# Altium PCB Pukk-Sensor-PCB.PcbDoc (part 5 of 6)
Units mil, origin at the board's own origin, x right, y up, seen from the top; angles counter-clockwise.
Board outline 3937.01 x 3149.61 mil, 4 copper layers (Top Layer, Layer 1, Layer 2, Bottom Layer), stack 61.653 mil thick; 261 components, 166 nets, 704 pads, 236 vias.
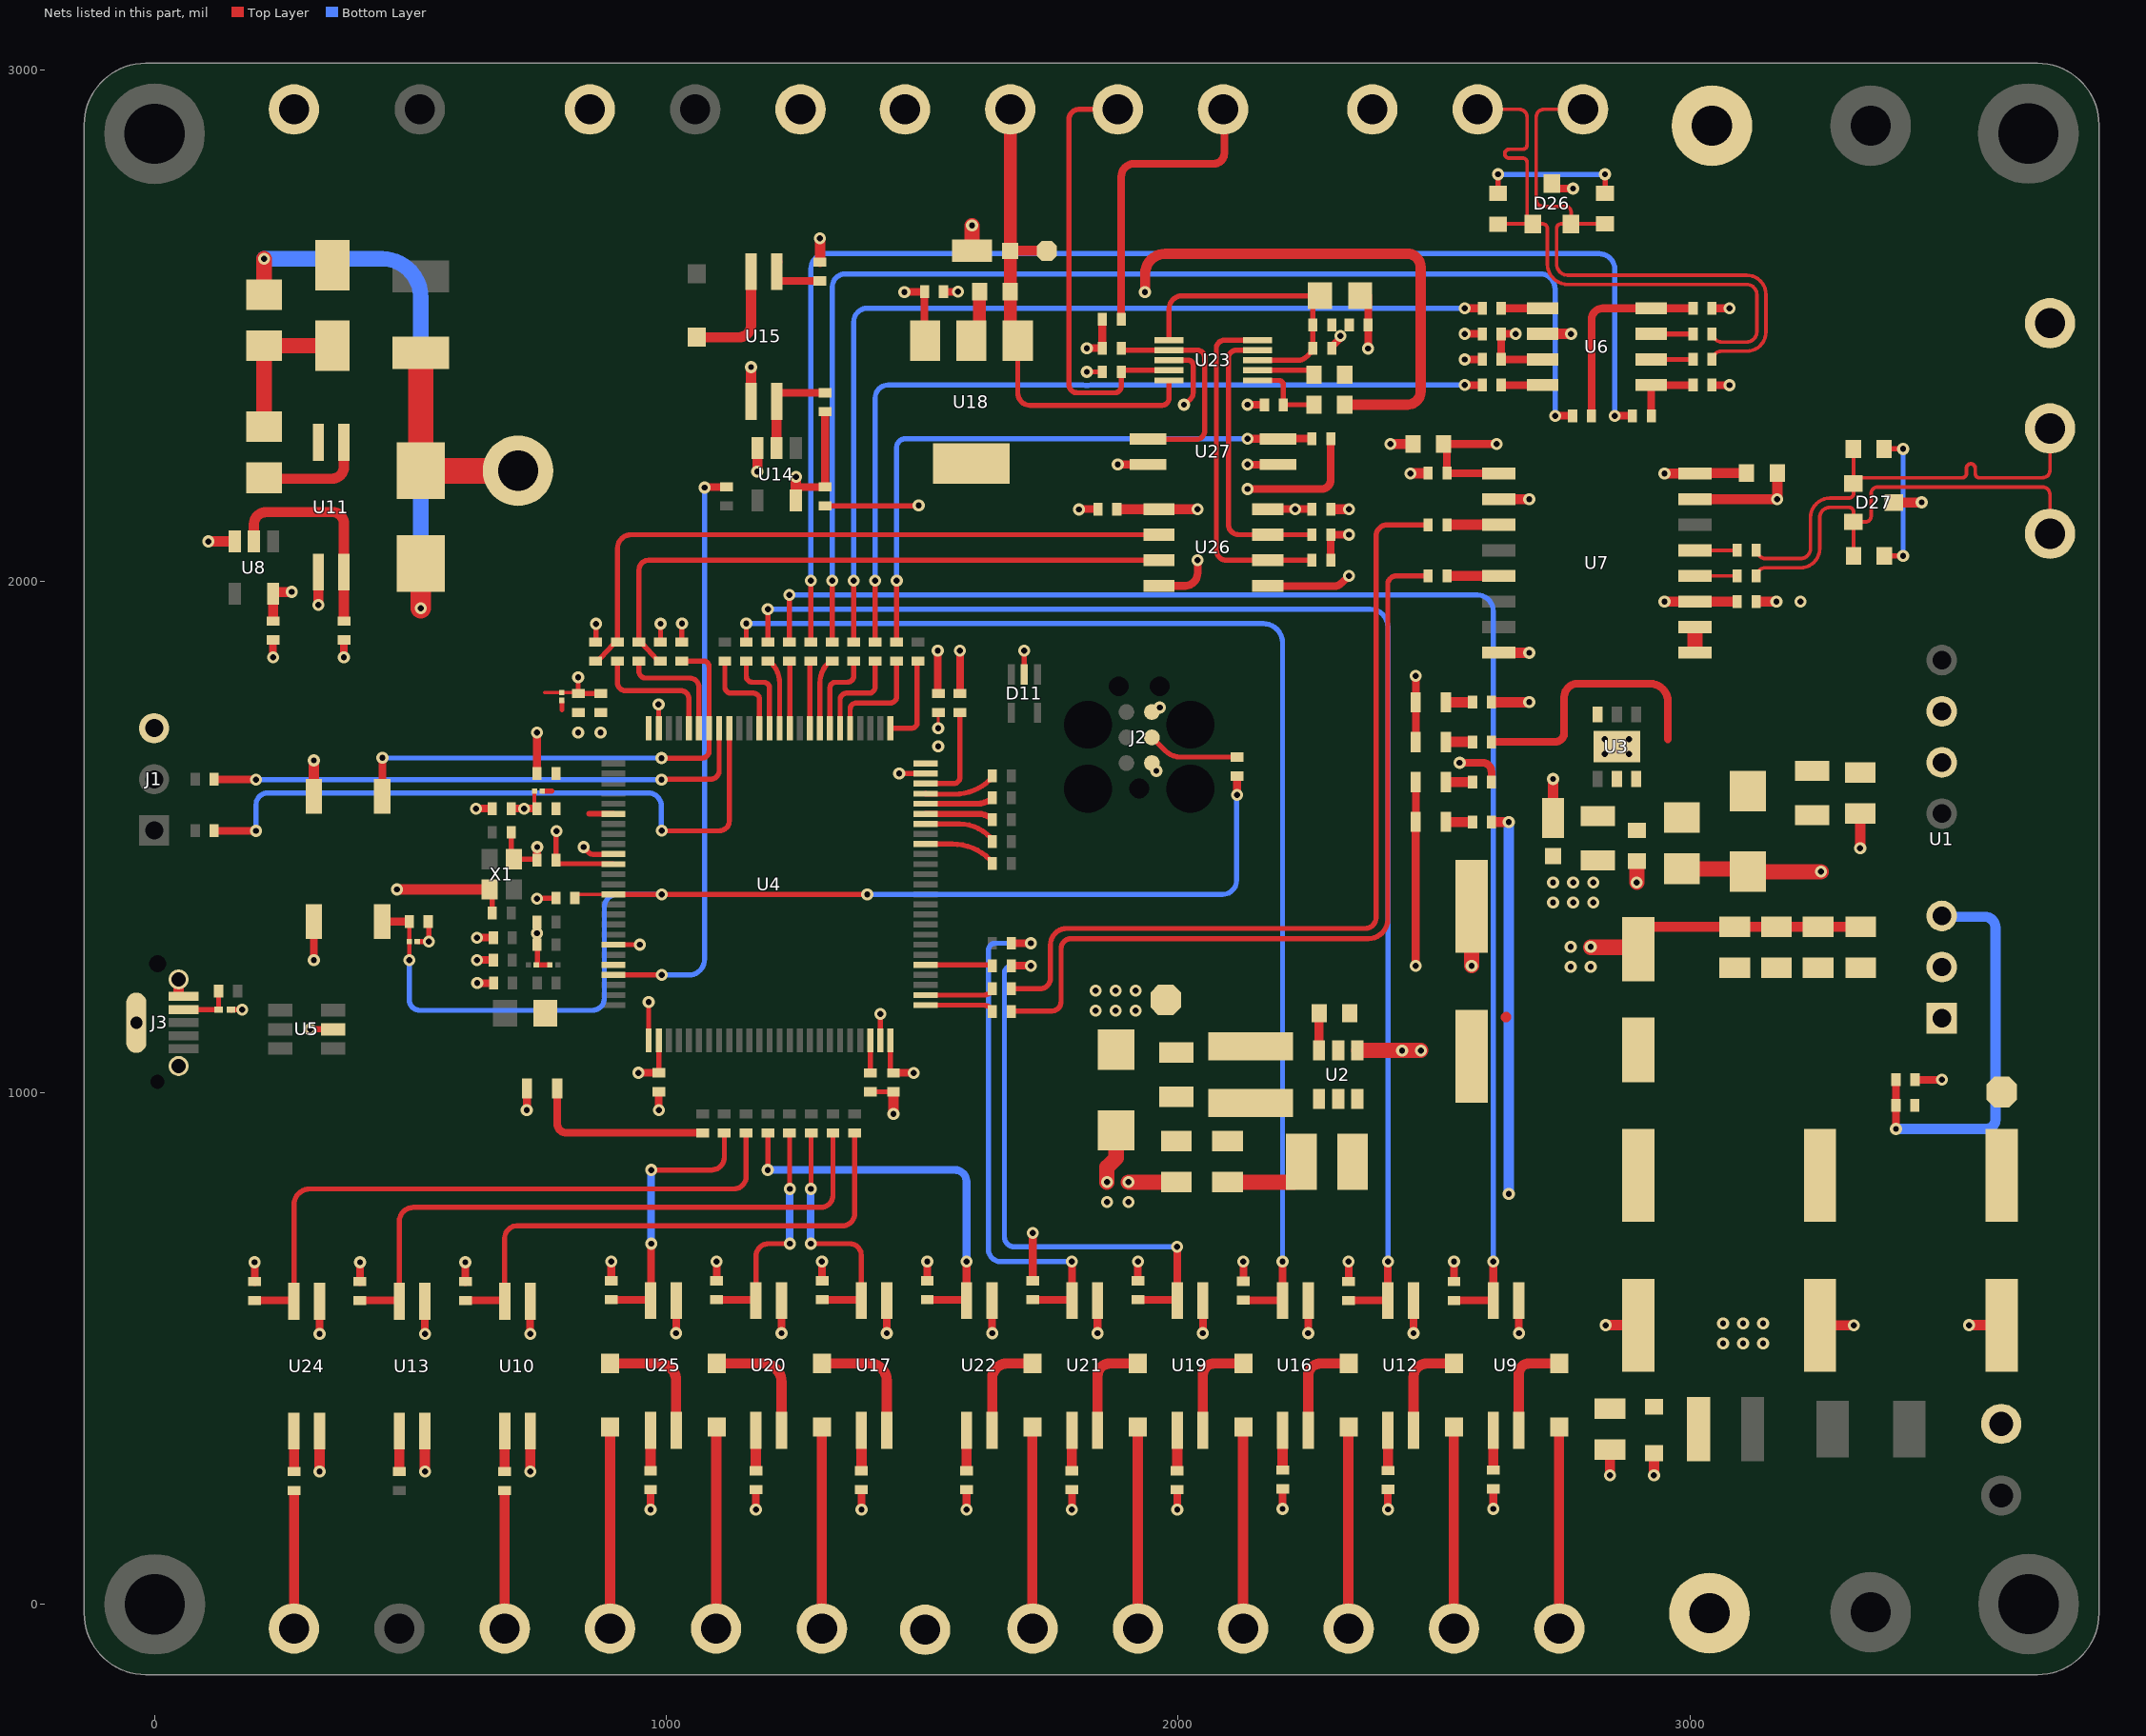
[diagram p4: the nets of this part, all layers, seen from the top]

## Via types
v1: diameter 23.62, hole 11.81, Top Layer to Bottom Layer, tented both sides, 234 vias
v2: diameter 23.62, hole 11.81, Top Layer to Bottom Layer, 2 vias

## Nets (pads, with @x,y where several pads share a name; then routed paths per layer and width w, separated by ;. In a path a pad name is that pad's centre, name@x,y a point inside that pad or via, vN(x,y) a via of type N, cw(c..) or ccw(c..) an arc to the next point about the centre after c; other vN are vias at no path point) (continued)
I2C_SDA: (continued)
  Top Layer w10: U23.9@2155.32,2451.36 2113.7,2451.36 ccw(c2113.7,2435.69) 2098.03,2435.69 2098.03,2110.91 ccw(c2118.22,2110.91) 2118.22,2090.72 U26.7@2175,2090.72 R98.1@2261.31,2090.72
LEFT: P4.1 R65.1 | length 267.5
  Top Layer w20: P4.1@683.76,-47.43 R65.1@683.76,220.03
NetC1_2: C1.2 F1.1 U1.6
NetC7_1: C7.1 L1.1 U2.5
NetC7_2: C7.2 U2.6 | length 75.6
  Top Layer w10: C7.2@2270.37,1155.28 cw(c2270.37,1150.28) C7.2@2275.38,1150.28
  Top Layer w18: U2.6@2275.38,1082.52 C7.2@2275.38,1150.28
NetC9_2: C9.2 C10.2 F3.1 L1.2 U2.1
NetC12_2: C12.2 F4.1 U3.2
NetC13_1: C13.1 U4.48 | length 63.5
  Top Layer w10: C13.1@1398.27,1038.72 U4.48@1398.27,1102.25
NetC14_1: C14.1 U4.73 | length 200.6
  Top Layer w10: U4.73@1506.54,1604.22 1560.96,1604.22 ccw(c1560.96,1616.72) 1573.46,1616.72 C14.1@1573.46,1743.23
NetC38_2: C38.2 C39.2 FB2.1 U23.1 U23.8 | length 591.8
  Top Layer w10: U23.1@1982.09,2471.05 1982.09,2532.09 cw(c2007.66,2532.09) 2007.66,2557.66 FB2.1@2276.95,2557.66 ; U23.8@2155.32,2431.68 2234.3,2431.68 ccw(c2234.3,2455.61) 2251.22,2438.69 2259.32,2446.79 2259.32,2450.69 C38.2@2263.32,2454.69 ; FB2.1@2261.32,2545.03 cw(c2273.95,2545.03) FB2.1@2264.15,2553 ; C38.2@2263.32,2451.19 C38.2@2263.32,2454.69 ; FB2.1@2263.32,2545.03 C38.2@2263.32,2454.69
NetD12_1: D12.1 J3.4 R46.2 | length 104.5
  Top Layer w10: J3.4@56.42,1162.36 56.51,1162.27 124.45,1162.27 D12.1@124.54,1162.17 124.69,1162.32 124.69,1198.23 R46.2@124.84,1198.38
NetD13_1: D13.1 U9.2 | length 201
  Top Layer w20: U9.2@2665.76,340.08 2665.76,450.41 cw(c2686.18,450.41) 2686.18,470.83 D13.1@2744.79,470.83
NetD14_1: D14.1 D15.2 J17.1 | length 420.5
  Top Layer w50: D14.1@519.83,2446.08 D15.2@519.83,2215.72 J17.1@710,2215.72
NetD15_1: D15.1 R66.1 | length 1114.2
  Top Layer w30: R66.1@213.7,2559.98 v1(213.7,2630)
  Top Layer w40: v1(519.83,1947) D15.1@519.83,2034.61
  Bottom Layer w30: v1(213.7,2630) 444,2630 cw(c444,2554.17) 519.83,2554.17 v1(519.83,1947)
NetD16_1: D16.1 U12.2 | length 198.3
  Top Layer w20: U12.2@2459.89,340.08 2459.89,444.15 cw(c2486.57,444.15) 2486.57,470.83 D16.1@2538.93,470.83
NetD17_1: D17.1 U15.2 | length 224.6
  Top Layer w20: D17.1@1059.11,2476.71 1141.95,2476.71 ccw(c1141.95,2500) 1165.24,2500 U15.2@1165.24,2605.19
NetD18_1: D18.1 U16.2 | length 199.4
  Top Layer w20: U16.2@2254.03,340.08 2254.03,446.6 cw(c2278.26,446.6) 2278.26,470.83 D18.1@2333.07,470.83
NetD19_1: D19.1 U17.2 | length 243.2
  Top Layer w20: D19.1@1303.76,470.83 1397.18,470.83 cw(c1397.18,437.42) 1430.59,437.42 U17.2@1430.59,340.08
NetD20_1: D20.1 U19.2 | length 200.1
  Top Layer w20: U19.2@2048.17,340.08 2048.17,448.28 cw(c2070.72,448.28) 2070.72,470.83 D20.1@2127.21,470.83
NetD22_1: D22.1 U20.2 | length 242.2
  Top Layer w20: D22.1@1097.9,470.83 1188.91,470.83 cw(c1188.91,435.01) 1224.72,435.01 U20.2@1224.72,340.08
NetD23_1: D23.1 U21.2 | length 199.4
  Top Layer w20: U21.2@1842.31,340.08 1842.31,446.6 cw(c1866.54,446.6) 1866.54,470.83 D23.1@1921.35,470.83
NetD24_1: D24.1 U22.2 | length 197.3
  Top Layer w20: U22.2@1636.45,340.08 1636.45,441.65 cw(c1665.63,441.65) 1665.63,470.83 D24.1@1715.48,470.83
NetD25_1: D25.1 U25.2 | length 243.2
  Top Layer w20: D25.1@892.04,470.83 985.45,470.83 cw(c985.45,437.42) 1018.86,437.42 U25.2@1018.86,340.08
NetD28_1: D28.1 R66.2 R67.1 | length 291
  Top Layer w30: R67.1@213.7,2302.1 R66.2@213.7,2459.98 D28.1@346.83,2459.98
NetFB1_2: FB1.2 U4.21
NetJ2_3: J2.3 R26.1 | length 178.2
  Top Layer w10: J2.3@1948.67,1694.31 1974.16,1668.83 1974.2,1668.78 ccw(c2004.9,1699.47) 2004.9,1656.07 ; 2004.94,1656.07 R26.1@2112.93,1656.07
NetLED1_1: LED1.1 R2.2 | length 45.5
  Top Layer w20: LED1.1@2527.23,1529.24 R2.2@2572.78,1529.24
NetLED2_1: LED2.1 R4.2 | length 45.5
  Top Layer w20: LED2.1@2527.22,1685.78 R4.2@2572.77,1685.78
NetLED3_1: LED3.1 R5.2 | length 45.5
  Top Layer w20: LED3.1@2527.23,1763.32 R5.2@2572.78,1763.32
NetLED4_1: LED4.1 R6.2 | length 45.5
  Top Layer w20: LED4.1@2527.22,1607.27 R6.2@2572.77,1607.27
NetLED5_1: LED5.1 R29.2 | length 363.4
  Top Layer w15: LED5.1@786.39,1008.57 786.39,939.84 ccw(c804.73,939.84) 804.73,921.5 R29.2@1070.59,921.5
NetR1_1: R1.1 R3.2 U1.3 | length 794.6
  Top Layer w10: v1(3402.53,929.05) v1@3402.77,929.29
  Top Layer w15: v1@3402.77,929.29 R3.2@3402.77,1025.24
  Bottom Layer w20: v1(3402.53,929.05) 3579.05,929.05 ccw(c3579.05,947) 3597,947 3597,1323 ccw(c3576,1323) 3576,1344 3493.84,1344 cw(c3493.84,1345.57) U1.3@3492.27,1345.57
NetR47_1: R47.1 R48.2 U6.8 | length 399.2
  Top Layer w15: R48.2@2807.71,2323.07 2807.71,2511.03 cw(c2830,2511.03) 2830,2533.32 U6.8@2924.52,2533.32 R47.1@3006.22,2533.32
NetR49_2: R49.2 U6.1 | length 80.7
  Top Layer w15: R49.2@2631.22,2533.32 U6.1@2711.92,2533.32
NetR50_1: R50.1 U6.7 | length 81.7
  Top Layer w10: U6.7@2924.52,2483.32 R50.1@3006.23,2483.32
NetR51_2: R51.2 U6.4 | length 80.7
  Top Layer w15: R51.2@2631.22,2383.32 U6.4@2711.92,2383.32
NetR52_1: R52.1 U6.6 | length 81.7
  Top Layer w10: U6.6@2924.52,2433.32 R52.1@3006.23,2433.32
NetR53_1: R53.1 R102.2 | length 283.1
  Top Layer w10: R53.1@2625.22,2757.75 v1(2625.22,2795.12) ; R102.2@2834.14,2758.27 v1(2834.14,2795.12)
  Bottom Layer w10: v1(2625.22,2795.12) v1(2834.14,2795.12)
NetR54_2: R54.2 R55.2 U6.5 | length 142.1
  Top Layer w10: U6.5@2924.52,2383.32 U6.5@2924.65,2383.19 ; R55.2@3006.09,2383.19 R55.2@3006.22,2383.06
  Top Layer w15: R54.2@2924.52,2323.06 U6.5@2924.52,2383.32 ; U6.5@2924.65,2383.19 R55.2@3006.09,2383.19
NetR56_2: R56.2 U7.3 | length 97.1
  Top Layer w20: R56.2@2529.15,2110.09 U7.3@2626.29,2110.09
NetR57_1: R57.1 U7.13 | length 82.1
  Top Layer w7: U7.13@3010.15,2060.09 R57.1@3092.22,2060.09
NetR58_2: R58.2 U7.5 | length 97.1
  Top Layer w20: R58.2@2529.15,2010.09 U7.5@2626.29,2010.09
NetR59_1: R59.1 U7.12 | length 82.1
  Top Layer w7: U7.12@3010.15,2010.09 R59.1@3092.22,2010.09
NetR60_1: R60.1 R103.2 | length 283.1
  Top Layer w10: R60.1@3379.28,2258.4 v1(3416.65,2258.4) ; R103.2@3379.8,2049.48 v1(3416.65,2049.48)
  Bottom Layer w10: v1(3416.65,2049.48) v1(3416.65,2258.4)
NetR62_1: R62.1 U8.2 U11.4 | length 421.9
  Top Layer w20: U8.2@193.7,2077.54 193.7,2110.96 cw(c217.72,2110.96) 217.72,2134.98 347.09,2134.98 cw(c347.09,2112.42) 369.64,2112.42 U11.4@369.64,2017.58 R62.1@369.64,1926.43
NetR64_2: R64.2 U9.1 | length 75.9
  Top Layer w20: R64.2@2615.76,265.58 U9.1@2615.76,341.5
NetR65_2: R65.2 U10.1 | length 75.9
  Top Layer w20: R65.2@683.76,262.66 U10.1@683.76,338.58
NetR67_2: R67.2 U11.1 | length 212.7
  Top Layer w20: R67.2@218.24,2200.2 346.48,2200.2 ccw(c346.48,2223.36) 369.64,2223.36 U11.1@369.64,2271.4
NetR70_2: R70.2 U12.1 | length 75.9
  Top Layer w20: R70.2@2409.89,264.8 U12.1@2409.89,340.71
NetR71_2: R71.2 U13.1 | length 75.9
  Top Layer w20: R71.2@477.9,262.66 U13.1@477.9,338.58
NetR72_1: R72.1 U14.2 U15.4 | length 201.7
  Top Layer w15: U15.4@1215.24,2351.37 1215.24,2364.7 1218.76,2368.22 R72.1@1310.74,2368.22
  Top Layer w20: U14.2@1215.24,2260 1215.24,2331.22 1215.24,2349.72 U15.4@1215.24,2351.37
NetR73_2: R73.2 U15.1 | length 100.1
  Top Layer w15: U15.1@1215.24,2605.19 U15.1@1218.76,2623.69 ; U15.1@1218.76,2586.69 R73.2@1300,2586.69
NetR76_2: R76.2 U16.1 | length 75.9
  Top Layer w20: R76.2@2204.03,265.58 U16.1@2204.03,341.5
NetR77_2: R77.2 U17.1 | length 75.9
  Top Layer w20: R77.2@1381.07,264.16 U17.1@1381.07,340.08
NetR79_1: R79.1 U18.2 U18.4 | length 105.6
  Top Layer w25: U18.2@1594.91,2469.8 ccw(c1594.91,2486.8) 1611.91,2486.8 R79.1@1611.91,2565.72
NetR81_2: R81.2 U19.1 | length 75.9
  Top Layer w20: R81.2@1998.17,264.16 U19.1@1998.17,340.08
NetR82_2: R82.2 U20.1 | length 75.9
  Top Layer w20: R82.2@1174.72,264.16 U20.1@1174.72,340.08
NetR86_2: R86.2 U21.1 | length 75.9
  Top Layer w20: R86.2@1792.31,264.16 U21.1@1792.31,340.08
NetR88_2: R88.2 U22.1 | length 75.9
  Top Layer w20: R88.2@1586.45,264.16 U22.1@1586.45,340.08
NetR90_2: R90.2 U24.1 | length 75.9
  Top Layer w20: R90.2@272.04,262.66 U24.1@272.04,338.58
NetR91_1: R91.1 R94.2 U23.6 | length 153.8
  Top Layer w10: U23.6@2155.32,2392.31 2196.53,2392.31 cw(c2196.53,2383.32) 2205.51,2383.32 R94.2@2205.51,2344.71 R91.1@2265.35,2344.71
NetR93_1: R93.1 U23.7 | length 110
  Top Layer w10: U23.7@2155.32,2411.99 R93.1@2265.35,2411.99
NetR96_2: R96.2 U25.1 | length 75.9
  Top Layer w20: R96.2@968.86,264.16 U25.1@968.86,340.08
NRST_MCU: C26.2 D10.2 R11.1 R26.2 SW1.1 U4.14 | length 2427.2
  Top Layer w7: R11.1@821.55,1387.68 U4.14@896.3,1387.68
  Top Layer w8: v1(497.33,1259.2) D10.2@497.35,1295.56 C26.2@497.33,1334.57
  Top Layer w10: U4.14@896.3,1387.68 v1(990.68,1387.68) v1(1392.4,1387.68)
  Top Layer w15: SW1.1@444.63,1334.57 C26.2@497.33,1334.57 ; v1(2115,1582) R26.2@2115,1617
  Bottom Layer w10: v1(497.33,1259.2) 497.33,1181.64 ccw(c517.98,1181.64) 517.98,1161 854.78,1161 ccw(c854.78,1184.93) 878.71,1184.93 878.71,1363.09 cw(c903.3,1363.09) 903.3,1387.68 v1(990.68,1387.68) ; v1(1392.4,1387.68) 2086.68,1387.68 ccw(c2086.68,1415) 2114,1415 2114,1581 cw(c2115,1581) v1(2115,1582)
OIL_PRESSURE: D25.2 P13.1 | length 393.2
  Top Layer w20: P13.1@889.62,-46.9 D25.2@889.62,346.28
OIL_TEMP: D22.2 P10.1 | length 394.7
  Top Layer w15: P10.1@1096.84,-47.43 P10.1@1097.37,-46.9 ; D22.2@1097.37,346.28 D22.2@1097.9,346.81
  Top Layer w20: P10.1@1097.37,-46.9 D22.2@1097.37,346.28
PA0: R12.1 U4.22 | length 1153.6
  Top Layer w10: U4.22@896.3,1230.2 v1(990.68,1230.2)
  Top Layer w15: v1(1074.78,2182.92) 1075.31,2183.45 1112.46,2183.45 R12.1@1113,2182.92
  Bottom Layer w10: v1(990.68,1230.2) 990.88,1230 1043.5,1230 ccw(c1043.5,1261) 1074.5,1261 v1@1074.5,2180
PA8: R16.1 U4.67 | length 133.3
  Top Layer w10: U4.67@1506.54,1486.11 1558.84,1486.11 1558.92,1486.11 cw(c1558.87,1382.92) R16.1@1631.76,1455.96
PA10: R19.1 U4.69 | length 142.6
  Top Layer w10: U4.69@1506.54,1525.48 1572.06,1525.48 1572.16,1525.48 cw(c1572.13,1443.18) 1633.11,1498.45 R19.1@1636.66,1490.95
PA11: R20.1 U4.70 | length 133.2
  Top Layer w12: U4.70@1506.54,1545.16 1609.12,1545.16 cw(c1609.12,1506.21) R20.1@1636.66,1533.76
PA12: R21.1 U4.71 | length 133.3
  Top Layer w12: U4.71@1506.54,1564.85 1608.39,1564.85 ccw(c1608.39,1604.83) R21.1@1636.66,1576.56
PA13: R23.1 U4.72 | length 142.5
  Top Layer w10: U4.72@1506.54,1584.53 ccw(c1507.51,1584.53) 1507.51,1583.56 1562.49,1583.56 ccw(c1562.72,1683.35) 1632.66,1612.17 R23.1@1636.66,1619.37
PA14: R25.1 U4.76 | length 179.3
  Top Layer w10: U4.76@1437.64,1712.49 1479.12,1712.49 1482.79,1713.14 ccw(c1479.12,1723.14) 1485.1,1714.32 1487.94,1717.16 ccw(c1479.12,1723.14) 1489.77,1723.14 1489.77,1839.87 R25.1@1491.64,1843.87
PB3: R13.2 U4.89 | length 188.7
  Top Layer w10: R13.2@1114.02,1843.87 1114.02,1793.26 ccw(c1126.29,1793.26) 1126.29,1781 1169.74,1781 cw(c1169.74,1769) 1181.74,1769 U4.89@1181.74,1712.49
PB6: R14.2 U4.92 | length 1325.1
  Top Layer w10: v1(990.68,1512.12) 991.1,1511.7 1102.99,1511.7 ccw(c1102.99,1531.39) 1122.68,1531.39 U4.92@1122.68,1712.49
  Top Layer w15: R14.2@117.5,1512.57 117.5,1512.14 197.44,1512.14 v1(197.86,1511.72)
  Bottom Layer w10: v1(197.86,1511.72) 197.86,1562.86 cw(c220.85,1562.86) 220.85,1585.85 963.98,1585.85 cw(c963.98,1559.83) 990,1559.83 990,1512.12 v1(990.68,1512.12)
PB7: R15.2 U4.93 | length 1079
  Top Layer w10: v1(990.41,1612.12) 990.86,1612.57 1085.75,1612.57 ccw(c1085.75,1629.81) 1102.99,1629.81 U4.93@1102.99,1712.49
  Top Layer w15: R15.2@117.5,1612.57 117.5,1612.14 197.44,1612.14 v1(197.86,1611.72)
  Bottom Layer w10: v1(197.86,1611.72) 198.06,1611.92 990.21,1611.92 v1(990.41,1612.12)
PB8: R17.2 U4.95 | length 235.1
  Top Layer w10: R17.2@945.97,1843.64 945.96,1839.87 945.93,1824.21 ccw(c959.64,1824.21) 959.64,1810.49 1045.19,1810.49 cw(c1045.19,1792.05) 1063.62,1792.05 U4.95@1063.62,1712.49
PB9: R18.2 U4.96 | length 257.6
  Top Layer w10: R18.2@904.24,1843.87 904.24,1801.28 ccw(c919.66,1801.28) 919.66,1785.86 1027.84,1785.86 cw(c1027.84,1769.76) 1043.94,1769.76 U4.96@1043.94,1712.49
PB12: R22.2 U4.51 | length 135.8
  Top Layer w10: U4.51@1506.54,1171.15 1525.16,1171.15 1619.78,1171.15 cw(c1619.78,1151.02) 1632.26,1166.81 1632.71,1166.37 R22.2@1636.66,1158.87
PB13: R24.2 U4.52 | length 135.9
  Top Layer w10: U4.52@1506.54,1190.83 1525.16,1190.83 1620.76,1190.83 ccw(c1620.74,1209.44) 1632.1,1194.7 1632.64,1195.25 1632.86,1195.47 R24.2@1636.66,1202.97
PC12: R27.1 U4.80 | length 211.6
  Top Layer w10: U4.80@1358.9,1712.49 1358.9,1749.66 cw(c1370.97,1749.66) 1370.97,1761.73 1437.18,1761.73 ccw(c1437.18,1774.23) 1449.68,1774.23 R27.1@1449.68,1843.87
PD0: R30.1 U4.81 | length 189.1
  Top Layer w10: U4.81@1339.22,1712.49 1339.22,1768.2 cw(c1352.01,1768.2) 1352.01,1781 1395.46,1781 ccw(c1395.46,1793.26) 1407.72,1793.26 R30.1@1407.72,1843.87
PD1: R31.1 U4.82 | length 167.8
  Top Layer w10: U4.82@1319.53,1712.49 1319.53,1791.7 1320.13,1795.21 cw(c1330.13,1791.7) 1321.4,1797.71 1324.12,1800.42 cw(c1330.13,1791.7) 1330.13,1802.29 1353.75,1802.29 ccw(c1353.69,1814.37) 1365.77,1814.37 R31.1@1365.77,1843.87
PD2: R32.1 U4.83 | length 140.7
  Top Layer w10: U4.83@1299.85,1712.49 1299.85,1800.64 ; 1299.85,1800.68 cw(c1356.62,1800.68) 1315.02,1839.32 1315.16,1839.45 1316.31,1840.61 R32.1@1323.81,1843.87
PD3: R33.1 U4.84 | length 131.8
  Top Layer w10: U4.84@1280.16,1712.49 1280.16,1839.78 cw(c1285.94,1839.78) R33.1@1281.85,1843.87
PD5: R34.1 U4.86 | length 131.6
  Top Layer w10: R34.1@1239.9,1843.87 cw(c1237.74,1841.71) 1240.79,1841.71 U4.86@1240.79,1712.49
PD6: R35.1 U4.87 | length 140.7
  Top Layer w10: R35.1@1197.14,1843.87 1204.64,1840.61 1205.79,1839.46 1205.93,1839.32 cw(c1164.33,1800.68) 1221.11,1800.68 ; U4.87@1221.11,1712.49 1221.11,1800.64
PD7: R36.1 U4.88 | length 166.6
  Top Layer w10: R36.1@1155.98,1843.87 1155.98,1814.37 ccw(c1168.06,1814.37) 1168,1802.29 1189.6,1802.29 cw(c1189.6,1790.48) 1201.42,1790.48 U4.88@1201.42,1712.49
PD8: R38.1 U4.55 | length 130.6
  Top Layer w10: U4.55@1506.54,1249.89 1632.26,1249.89 cw(c1632.26,1243.66) R38.1@1636.66,1248.07